# Altium PCB SOLAR_CLEANER_PCB.PcbDoc (part 1 of 2)
Units mm, origin at the board's own origin, x right, y up, seen from the top; angles counter-clockwise.
Board outline 138.79 x 100.69 mm, 2 copper layers (Top Layer, Bottom Layer); 75 components, 78 nets, 389 pads, 294 vias.
Unrouted connection lines stored in the file: 2.
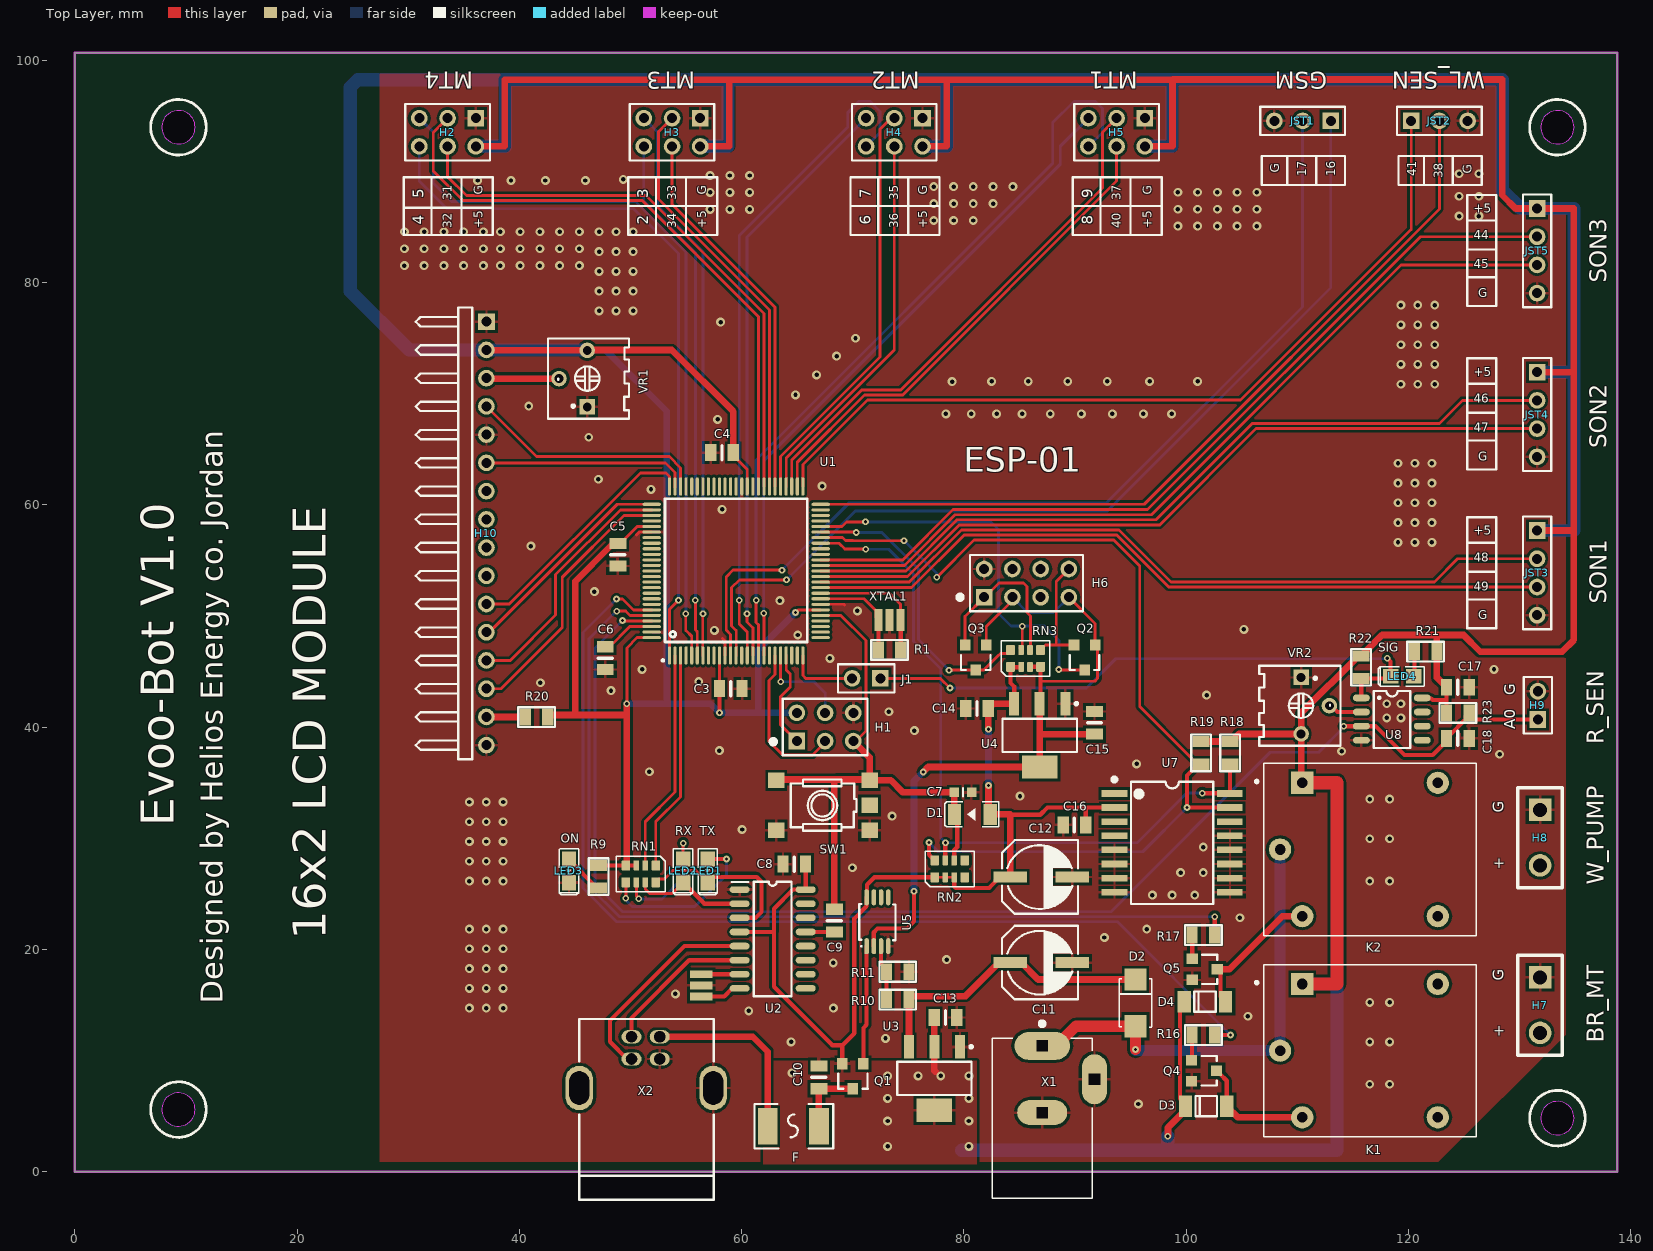
[diagram p0: Top Layer view]
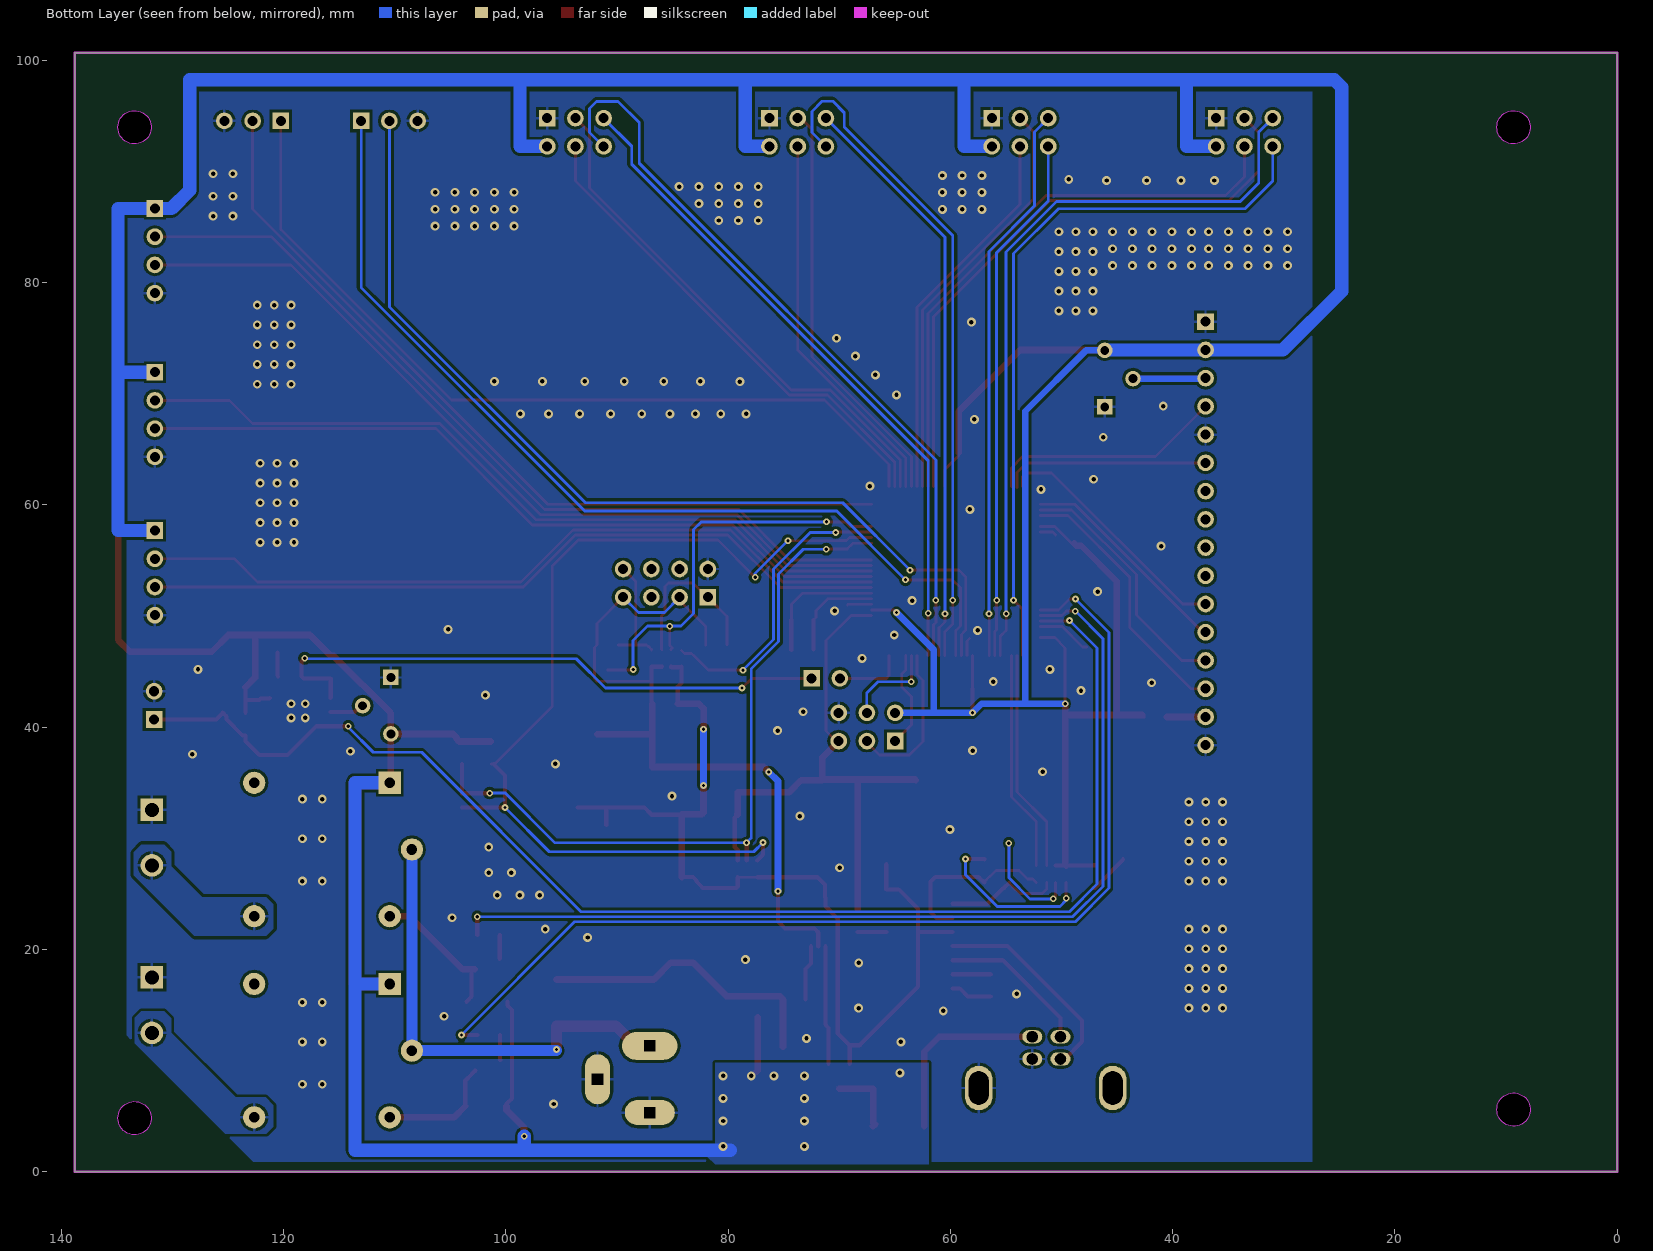
[diagram p1: Bottom Layer view, seen from below]
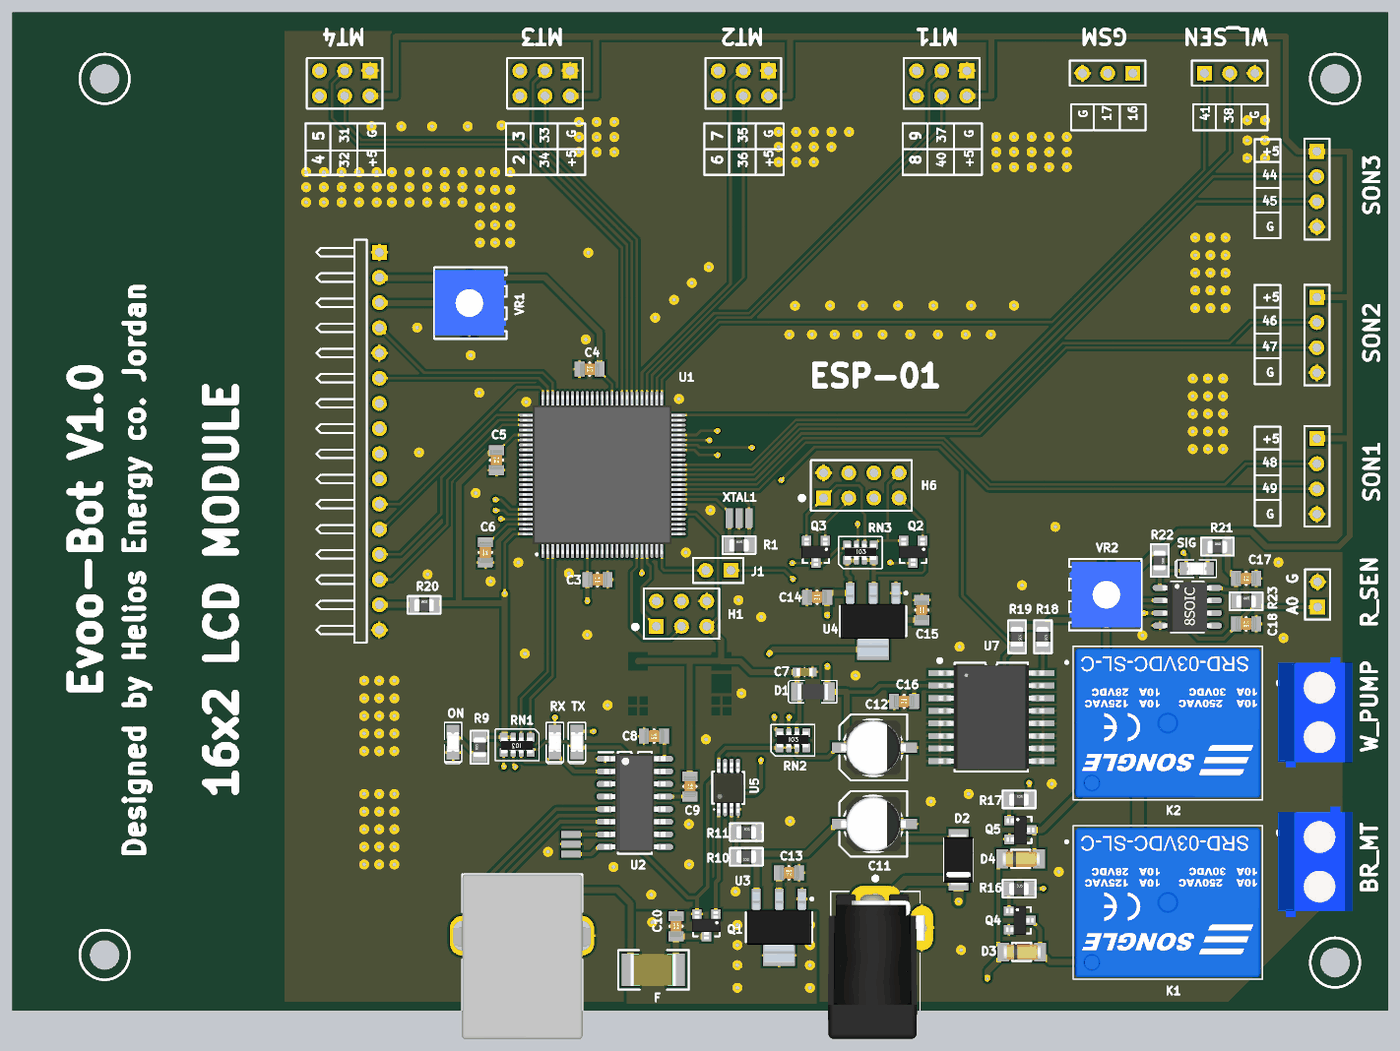
[diagram p2: 3D render of the assembled board from above, using the file's embedded part models]

## Layer stack, top to bottom
Top Solder: solder mask 0.0102, Solder Resist, Dk 3.5
Top Layer: signal copper 0.0356
Dielectric 1: dielectric 0.32, FR-4, Dk 4.8
Bottom Layer: signal copper 0.0356
Bottom Solder: solder mask 0.0102, Solder Resist, Dk 3.5

## Board outline
0,0 138.79,0 138.79,100.69 0,100.69

## Design rules (kind name [scope] priority, off if disabled: settings)
Clearance [All] p1: gap=0.254 ignorepadtopadclearanceinfootprint=FALSE except(0.127: SMDPad-SMDPad; 0.2: Arc-Arc Arc-Track Arc-SMDPad Track-Track Track-SMDPad; 0.54: THPad-THPad)
HoleSize [All] p1: absolutevalues=TRUE maxlimit=6.3 minlimit=0.2 maxpercent=80.000 minpercent=20.000
HoleToHoleClearance [All] p1: gap=0.54 allowstackedmicrovias=TRUE
MinimumAnnularRing [All] p1: minimumring=0.13
MinimumSolderMaskSliver [All] p1: minsoldermaskwidth=0.03
NetAntennae [All] p1: netantennaetolerance=0.127
PolygonConnect [All] p1: thpad.connectstyle=Relief thpad.reliefconductorwidth=0.254 thpad.reliefentries=4 thpad.polygonreliefangle="90 Angle" thpad.airgapwidth=0.254 smdpad.connectstyle=Relief smdpad.reliefconductorwidth=0.254 smdpad.reliefentries=4 smdpad.polygonreliefangle="90 Angle" smdpad.airgapwidth=0.254 via.connectstyle=Direct via.reliefconductorwidth=0.254 via.reliefentries=4 via.polygonreliefangle="90 Angle" via.airgapwidth=0.254
RoomDefinition Sensors [InComponentClass('Sensors')] p1: confinementstyle=ConfineOut formatcopy=TRUE lockcomponents=FALSE outline 145.05,60.812 355.235,60.812 355.235,104.5 145.05,104.5
RoomDefinition ESP01-Schematic [InComponentClass('ESP01-Schematic')] p2: confinementstyle=ConfineOut formatcopy=TRUE lockcomponents=FALSE outline 144.593,44.704 182.693,44.704 182.693,58.674 144.593,58.674
RoomDefinition CH340-Sch [InComponentClass('CH340-Sch')] p3: confinementstyle=ConfineOut formatcopy=TRUE lockcomponents=FALSE outline 145.863,23.622 321.504,23.622 321.504,43.307 145.863,43.307
RoomDefinition ATMEGA2560-Schematic [InComponentClass('ATMEGA2560-Schematic')] p4: confinementstyle=ConfineOut formatcopy=TRUE lockcomponents=FALSE outline 144.593,1.397 261.941,1.397 261.941,22.479 144.593,22.479
RoutingVias [All] p1: holewidth=0.342 width=0.721 viastyle="Through Hole" minholewidth=0.3 minwidth=0.6 maxholewidth=0.4 maxwidth=0.8
SilkToSolderMaskClearance [IsPad] p1: minsilkscreentomaskgap=0.15 clearancetoexposedcopper=TRUE
SolderMaskExpansion [All] p1: expansion=0.102
Width [All] p1: maxlimit=0.6 minlimit=0.254 preferedwidth=0.381 minimp=50.000000 maximp=50.000000 favimp=50.000000
25 further rules are at their usual default settings.

## Classes and differential pairs
component class Sensors: 0. C16 C17 C18 D3 D4 H7 H8 H9 H10 J1 JST1 JST2 JST3 JST4 JST5 K1 K2 LED4 Q4 Q5 R16 R17 R18 R19 R20 R21 R22 R23 U7 U8 VR1 VR2
component class ESP01-Schematic: H6 Q2 Q3 RN3
component class CH340-Sch: C8 C9 C10 C11 C12 C13 C14 C15 D2 F LED1 LED2 LED3 Q1 R9 R10 R11 RN1 U2 U3 U4 U5 U6 X1 X2
component class ATMEGA2560-Schematic: C3 C4 C5 C6 C7 D1 H1 H2 H3 H4 H5 R1 RN2 SW1 U1

## Components (designator, comment, footprint, x,y, rotation, side; value= is the part's Value field where it differs from the comment)
C3 "100nF" SMD-0805C 59.03,43.47 r90 top value=10000pF
C4 "100nF" SMD-0805C 58.24,64.71 r270 top value=10000pF
C5 "100nF" SMD-0805C 48.86,55.52 r0 top value=10000pF
C6 "100nF" SMD-0805C 47.73,46.22 r0 top value=10000pF
C7 "22pF" SMD-0603C 79.92,34.14 r90 top value=10000pF
C8 "100nF" SMD-0805C 64.74,27.68 r90 top value=10000pF
C9 "100nF" SMD-0805C 68.35,22.6 r180 top value=10000pF
C10 "100nF" SMD-0805C 66.95,8.5 r180 top value=10000pF
C11 "Cap Pol2" Elec-Cap-SMD 86.96,18.82 r0 top value="47uF 25V"
C12 "Cap Pol2" Elec-Cap-SMD 86.96,26.52 r0 top value="47uF 25V"
C13 "100nF" SMD-0805C 78.343,13.887 r270 top value=10000pF
C14 "10uF" SMD-0805C 81.18,41.69 r270 top value=10000pF
C15 "10uF" SMD-0805C 91.75,40.4 r180 top value=10000pF
C16 "100nF" SMD-0805C 89.95,31.2 r270 top value=10000pF
C17 "100nF" SMD-0805C 124.45,43.6 r90 top value=10000pF
C18 "100nF" SMD-0805C 124.45,39 r90 top value=10000pF
D1 "Diode" D1206-RD 80.76,32.16 r0 top
D2 "Diode" D0214AC(SMA-2) 95.45,15.2 r90 top
D3 "1N4148" "LL4148-L3.7 SMD(LCSC)" 99.95,5.9 r0 top
D4 "1N4148" "LL4148-L3.7 SMD(LCSC)" 99.842,15.3 r0 top
F "Fuse 1" "MF-MSMF050-2 (LCSC)" 62.35,4.1 r0 top
H1 "ICSP" HDR2X3 64.97,38.76 r0 top
H2 "MT4" HDR2X3 36.08,94.805 r180 top
H3 "MT3" HDR2X3 56.28,94.805 r180 top
H4 "MT2" HDR2X3 76.28,94.805 r180 top
H5 "MT1" HDR2X3 96.28,94.805 r180 top
H6 "Header 4X2" HDR2X4 81.83,51.7 r0 top
H7 "BR_MT" Header_I2 130.85,14 r180 top
H8 "W_PUMP" Header_I2 130.85,29.07 r180 top
H9 "R_SEN" HDR1X2 131.65,40.7 r90 top
H10 "Header 16H" HDR1X16H 37.04,76.49 r270 top locked
J1 "Jumper" HDR1X2 72.49,44.4 r180 top
JST1 "GSM" HDR1X3 113.02,94.56 r180 top
JST2 "WL_SEN" HDR1X3 120.25,94.56 r0 top
JST3 "SON1" HDR1X4 131.58,57.7 r270 top
JST4 "SON2" HDR1X4 131.58,71.95 r270 top
JST5 "SON3" HDR1X4 131.58,86.68 r270 top
K1 "SRD-05VDC-SL-C" SRD-05VDC-SL-C 116.55,10.9 r0 top
K2 "SRD-05VDC-SL-C" SRD-05VDC-SL-C 116.55,29 r0 top
LED1 "TX" Blue_LED_0805 56.94,27.08 r90 top
LED2 "RX" Blue_LED_0805 54.72,27.08 r90 top
LED3 "ON" RED_LED_0805 44.45,27.072 r90 top
LED4 "SIG" RED_LED_0805 119.45,44.6 r0 top
Q1 "FDN340P" SOT-23-3 70.005,8.63 r180 top
Q2 "BSS138" SMT_TRIODE_NPN 90.85,46.3 r180 top
Q3 "BSS138" SMT_TRIODE_NPN 81.05,46.3 r180 top
Q4 "NPN" SMT_TRIODE_NPN 101.595,9.088 r270 top
Q5 "NPN" SMT_TRIODE_NPN 101.65,18.2 r270 top
R1 "1M" SMD-0805-RES 73.31,46.96 r270 top value=1.1
R9 "1K" SMD-0805-RES 47.13,26.56 r0 top value=1.1
R10 "10K" SMD-0805-RES 74.05,15.5 r90 top value=1.1
R11 "10K" SMD-0805-RES 74.05,18 r270 top value=1.1
R16 "" SMD-0805-RES 101.55,12.3 r270 top value=1K
R17 "" SMD-0805-RES 101.55,21.3 r270 top value=1K
R18 "4.7K" SMD-0805-RES 103.95,37.7 r180 top value=1
R19 "4.7K" SMD-0805-RES 101.35,37.7 r180 top value=1
R20 "220" SMD-0805-RES 41.55,40.92 r270 top value=1
R21 "1K" SMD-0805-RES 121.55,46.8 r270 top value=1
R22 "10K" SMD-0805-RES 115.75,45.4 r180 top value=1
R23 "10K" SMD-0805-RES 124.45,41.3 r270 top value=1
RN1 "1K" RA0603-8 50.93,26.8 r180 top
RN2 "10K" RA0603-8 78.73,27.26 r0 top
RN3 "10K" RA0603-8 85.55,46.2 r0 top
SW1 "SPDT SW" SPDT-5Pin 69.488,-52.709 r180 top
U1 "ATMEGA2560-16AU" TQFP-100(LCSC) 59.513,54.062 r0 top
U2 "CH340C" "SOIC-16 150MIL(LCSC)" 62.795,20.947 r0 top
U3 "AMS117-5.0" SOT-223 77.273,8.426 r270 top
U4 "AMS117-3.3" SOT-223 86.75,39.3 r270 top
U5 "LM358N" VSSOP-8 71.25,18.69 r90 top
U7 "DS3231SN#" DS3231(Module-footprint) 98.75,29.6 r0 top
U8 "LM393EDR2G" SOIC-8 114.7,42.64 r0 top
VR1 "RPot" VR7(LCSC) 46.11,71.37 r90 top value=10K
VR2 "RPot" VR7(LCSC) 110.35,41.94 r270 top value=10K
X1 "PJ-002A" PJ-002A 87.052,11.326 r270 top
X2 "USB-TH" "USB-TypeB Female (LCSC)" 44.896,9.241 r0 top

## Footprints (in the part's own frame and the unit in brackets; to place one, negate y for a bottom-side part, rotate by r counter-clockwise, add the part's x,y. Pads: shape width x height; smd on the part's side, far side on the other; paste and mask are expansions set on the pad)
Blue_LED_0805 [mm] "SMT 0805 Blue LED"
  rect 1.4x1.3 smd: 1(1.05,-0.02) 2(-1.05,-0.02)
  silkscreen extent -2.17,-0.89 1.98,0.86, body extent -1,-0.64 1,0.61, height 0.8
D0214AC(SMA-2) [mm] "SMA D0214AC Schottky Barrier Diode"
  rect 2x2 smd: 1(-2.1,0) 2(2.1,0)
  silkscreen extent -2.18,-1.48 2.18,1.48, body extent -2.63,-1.47 2.65,1.45, height 2.41
D1206-RD [mm] "Switching Chip Diode by Bourns, 1206 Package Type"
  rect 1.2x1.9 smd: 1(-1.6,0) 2(1.6,0)
  silkscreen extent -2.47,-1.13 2.4,1.13, body extent -1.53,-0.78 1.52,0.77, height 0.65
DS3231(Module-footprint) [mm]
  rect 2.3x0.6 smd paste+0 mask+0: 1(-5.195,4.445) 2(-5.195,3.175) 3(-5.195,1.905) 4(-5.195,0.635) 5(-5.195,-0.635) 6(-5.195,-1.905) 7(-5.195,-3.175) 8(-5.195,-4.445) 9(5.195,-4.445) 10(5.195,-3.175) 11(5.195,-1.905) 12(5.195,-0.635) 13(5.195,0.63) 14(5.194,1.905) 15(5.194,3.175) 16(5.194,4.445)
  silkscreen extent -5.3,-5.5 3.7,5.8, body extent -5.32,-5.24 5.32,5.25, height 2.64
Elec-Cap-SMD [mm] "L6.6-W6.6-H7.0-LS7.2"
  rect 3x1 smd: 1(-2.8,0) 2(2.8,0)
  silkscreen extent -3.53,-3.3 3.3,3.32, body extent -3.36,-2.76 3.14,2.74, height 5.5
HDR1X2 [mm] "Connector; Header; 2 Position"
  rect 1.5x1.5 hole 0.9: 1(0,0)
  round 1.5 hole 0.9: 2(2.54,0)
  silkscreen extent -1.27,-1.27 3.81,1.27
HDR1X3 [mm] "Connector; Header; 3 Position"
  rect 1.5x1.5 hole 0.9: 1(0,0)
  round 1.5 hole 0.9: 2(2.54,0) 3(5.08,0)
  silkscreen extent -1.27,-1.27 6.35,1.27
HDR1X4 [mm] "Connector; Header; 4 Position"
  rect 1.5x1.5 hole 0.9: 1(0,0)
  round 1.5 hole 0.9: 2(2.54,0) 3(5.08,0) 4(7.62,0)
  silkscreen extent -1.27,-1.27 8.89,1.27
HDR1X16H [mm] "Connector; Header; 16 Position; Right Angle"
  rect 1.5x1.5 hole 0.9: 1(0,0)
  round 1.5 hole 0.9: 2(2.54,0) 3(5.08,0) 4(7.62,0) 5(10.16,0) 6(12.7,0) 7(15.24,0) 8(17.78,0) 9(20.32,0) 10(22.86,0) 11(25.4,0) 12(27.94,0) 13(30.48,0) 14(33.02,0) 15(35.56,0) 16(38.1,0)
  silkscreen extent -1.27,-6.35 39.37,-1.27
HDR2X3 [mm] "Connector; Header; 3x2 Position"
  rect 1.5x1.5 hole 0.9: 1(0,0)
  round 1.5 hole 0.9: 2(0,2.54) 3(2.54,0) 4(2.54,2.54) 5(5.08,0) 6(5.08,2.54)
  silkscreen extent -1.27,-1.27 6.35,3.81
HDR2X4 [mm] "Connector; Header; 4x2 Position"
  rect 1.5x1.5 hole 0.9: 1(0,0)
  round 1.5 hole 0.9: 2(0,2.54) 3(2.54,0) 4(2.54,2.54) 5(5.08,0) 6(5.08,2.54) 7(7.62,0) 8(7.62,2.54)
  silkscreen extent -1.27,-1.27 8.89,3.81
Header_I2 [mm] "2-pin Custom Header"
  round 2.032 hole 1.27 mask+0.005: 1(-1,1.5)
  rect 2.032x2.032 hole 1.27 mask+0.005: 2(-1,-3.5)
  silkscreen extent -3,-5.5 1,3.5, body extent -4.3,-6.58 3.2,4.58, height 10
"LL4148-L3.7 SMD(LCSC)" [mm] "LL-34_L3.7-W1.6-RD, Reference to T4 Diode"
  rect 1.2x1.9 smd: 1(3.708,0) 2(0,0)
  silkscreen extent 0.9,-0.91 2.82,0.92, body extent 0.06,-0.8 3.76,0.8, height 1.59
"MF-MSMF050-2 (LCSC)" [mm] "Fuse by Bourns SMD CODE-506J"
  rect 1.78x3.3 smd: 1(0,0) 2(4.61,0)
  silkscreen extent -1.2,-2 5.9,2, body extent 0.03,-1.62 4.58,1.62, height 0.85
PJ-002A [mm]
  oval 2.5x5 hole 1 square: 1(0,0)
  oval 2.25x4.5 hole 1 square: 2(6,0)
  oval 4.5x2.25 hole 1 square: 3(3,4.7)
  silkscreen extent -2.2,-4.5 13.7,4.5, body extent -0.44,-4.78 14.18,4.99, height 12
RA0603-8 [mm]
  rrect25% 0.8x0.9 smd: 1(-1.35,-0.762) 4(1.35,-0.762) 5(1.35,0.762) 8(-1.35,0.762)
  rrect25% 0.5x0.89 smd: 2(-0.4,-0.762) 7(-0.4,0.762)
  rrect25% 0.5x0.9 smd: 3(0.4,-0.762) 6(0.4,0.762)
  silkscreen extent -2.2,-1.6 2.2,1.6, body extent -1.6,-0.73 1.6,0.87, height 0.61
RED_LED_0805 [mm] "SMT 0805 Red LED"
  rect 1.4x1.3 smd: 1(1.05,-0.02) 2(-1.05,-0.02)
  silkscreen extent -2.16,-0.9 1.99,0.85, body extent -1,-0.64 1,0.61, height 0.8
SMD-0603C [mm]
  rect 0.85x0.85 smd: 1(0,0.775) 2(0,-0.775)
  silkscreen extent -0.4,0 0.4,0, body extent -0.4,-0.8 0.4,0.8, height 0.9
SMD-0805-RES [mil]
  rect 60x40 smd: 1(0,40) 2(0,-40)
  silkscreen extent -35,-65 35,65, body extent -24,-39 26,39, height 31
SMD-0805C [mil]
  rect 60x40 smd: 1(0,40) 2(0,-40)
  silkscreen extent -25,0 25,0, body extent -25,-39 25,39, height 35
SMT_TRIODE_NPN [mm] "Surface mount NPN transistor, package SOT-23"
  rect 0.95x1 smd: 1(-0.962,-1.095) 2(0.938,-1.095) 3(-0.012,1.155)
  silkscreen extent -1.34,-0.2 1.31,1.15, body extent -1.46,-1.37 1.44,1.43, height 1.3
SOIC-8 [mm] "_L5.0-W4.0-P1.27-LS6.0-BL"
  oval 1.52x0.6 smd: 1(1.07,0) 2(1.07,-1.27) 3(1.07,-2.54) 4(1.07,-3.81) 5(6.55,-3.81) 6(6.55,-2.54) 7(6.55,-1.27) 8(6.55,0)
  silkscreen extent 2.18,-4.5 5.46,0.63, body extent 0.69,-4.41 6.89,0.59, height 1.5
"SOIC-16 150MIL(LCSC)" [mm] "L10.0-W3.9-P1.27-LS6.0-BL"
  oval 1.8x0.6 smd: 1(-2.972,4.445) 2(-2.972,3.175) 3(-2.972,1.905) 4(-2.972,0.635) 5(-2.972,-0.635) 6(-2.972,-1.905) 7(-2.972,-3.175) 8(-2.972,-4.445) 9(2.972,-4.445) 10(2.972,-3.175) 11(2.972,-1.905) 12(2.972,-0.635) 13(2.972,0.635) 14(2.972,1.905) 15(2.972,3.175) 16(2.972,4.445)
  silkscreen extent -3.68,-5.15 1.7,5.15, body extent -3.1,-4.95 3.1,4.96, height 1.7
SOT-23-3 [mm] "Surface mount NPN transistor, package SOT-23"
  rect 0.95x1 smd: 1(-0.962,-1.095) 2(0.938,-1.095) 3(-0.012,1.155)
  silkscreen extent -1.34,-0.2 1.31,1.15, body extent -1.46,-1.37 1.44,1.43, height 1.3
SOT-223 [mm] "3 LEAD SOT-223 PLASTIC PACKAGE"
  rect 2.1x0.9 smd: 1(-2.825,2.376) 2(-2.825,0.076) 3(-2.825,-2.224)
  rect 2.1x3.2 smd: 2(2.875,0.076)
  silkscreen extent -2.95,-3.27 1.53,3.5, body extent -3.52,-3.17 3.57,3.33, height 1.65
SPDT-5Pin [mm]
  rect 1.5x1.425 smd: 1(-2.032,-83.439) 2(6.368,-83.439) 3(-2.032,-87.939) 4(6.368,-87.939) 5(-2.032,-85.689)
  silkscreen extent -0.86,-88 5.07,-83.4, body extent -2.34,-88.71 6.68,-82.67, height 5
SRD-05VDC-SL-C [mm] "SRD05VDC Relay , SPDT, 5 pin"
  rect 2x2 hole 0.95: A1(-6.1,6)
  round 2 hole 0.95: A2(-6.1,-6) COM(-8.1,0) NC(6.1,6) NO(6.1,-6)
  silkscreen extent -10.3,-7.75 9.55,7.75, body extent -9.35,-7.54 9.35,7.54, height 14.94
TQFP-100(LCSC) [mm] "_L14.0-W14.0-P0.50-LS16.0-BL"
  oval 0.28x1.65 smd: 1(-6,-7.6) 2(-5.5,-7.6) 3(-5,-7.6) 4(-4.5,-7.6) 5(-4,-7.6) 6(-3.5,-7.6) 7(-3,-7.6) 8(-2.5,-7.6) 9(-2,-7.6) 10(-1.5,-7.6) 11(-1,-7.6) 12(-0.5,-7.6) 13(0,-7.6) 14(0.5,-7.6) 15(1,-7.6) 16(1.5,-7.6) 17(2,-7.6) 18(2.5,-7.6) 19(3,-7.6) 20(3.5,-7.6) 21(4,-7.6) 22(4.5,-7.6) 23(5,-7.6) 24(5.5,-7.6) 25(6,-7.6) 51(6,7.6) 52(5.5,7.6) 53(5,7.6) 54(4.5,7.6) 55(4,7.6) 56(3.5,7.6) 57(3,7.6) 58(2.5,7.6) 59(2,7.6) 60(1.5,7.6) 61(1,7.6) 62(0.5,7.6) 63(0,7.6) 64(-0.5,7.6) 65(-1,7.6) 66(-1.5,7.6) 67(-2,7.6) 68(-2.5,7.6) 69(-3,7.6) 70(-3.5,7.6) 71(-4,7.6) 72(-4.5,7.6) 73(-5,7.6) 74(-5.5,7.6) 75(-6,7.6)
  oval 1.65x0.28 smd: 26(7.6,-6) 27(7.6,-5.5) 28(7.6,-5) 29(7.6,-4.5) 30(7.6,-4) 31(7.6,-3.5) 32(7.6,-3) 33(7.6,-2.5) 34(7.6,-2) 35(7.6,-1.5) 36(7.6,-1) 37(7.6,-0.5) 38(7.6,0) 39(7.6,0.5) 40(7.6,1) 41(7.6,1.5) 42(7.6,2) 43(7.6,2.5) 44(7.6,3) 45(7.6,3.5) 46(7.6,4) 47(7.6,4.5) 48(7.6,5) 49(7.6,5.5) 50(7.6,6) 76(-7.6,6) 77(-7.6,5.5) 78(-7.6,5) 79(-7.6,4.5) 80(-7.6,4) 81(-7.6,3.5) 82(-7.6,3) 83(-7.6,2.5) 84(-7.6,2) 85(-7.6,1.5) 86(-7.6,1) 87(-7.6,0.5) 88(-7.6,0) 89(-7.6,-0.5) 90(-7.6,-1) 91(-7.6,-1.5) 92(-7.6,-2) 93(-7.6,-2.5) 94(-7.6,-3) 95(-7.6,-3.5) 96(-7.6,-4) 97(-7.6,-4.5) 98(-7.6,-5) 99(-7.6,-5.5) 100(-7.6,-6)
  silkscreen extent -6.7,-8.15 6.4,6.5, body extent -8,-8 8,8, height 1.2
"USB-TypeB Female (LCSC)" [mm] "USB-B-TH_U241-041N-1BR85-1"
  oval 1.8x1.2 hole 1 slot 1.001 at 90 deg: 1(7.739,2.909) 2(5.199,2.909) 3(5.199,0.909) 4(7.739,0.909)
  oval 2.5x4 hole 1.8 slot 3 at 90 deg: 5(12.55,-1.7) 6(0.5,-1.7)
  silkscreen extent 0.5,-11.76 12.6,4.5, body extent -0.9,-12.1 14,4.5, height 10.75
VR7(LCSC) [mm] "Through Hole, 3 Leads, Pitch 5.08mm Trimmer"
  rect 1.4x1.4 hole 0.8: 1(-2.54,0)
  round 1.4 hole 0.8: 2(0,2.54) 3(2.54,0)
  silkscreen extent -3.6,-3.77 3.6,3.54, body extent -3.3,-3.7 3.3,3.5, height 4.7
VSSOP-8 [mm] "L3.0-W3.0-H1.1-LS4.9-P0.65"
  oval 1.45x0.4 smd: 1(1.61,0) 2(1.61,-0.65) 3(1.61,-1.3) 4(1.61,-1.95) 5(6.01,-1.95) 6(6.01,-1.3) 7(6.01,-0.65) 8(6.01,0)
  silkscreen extent 1.59,-2.6 5.4,0.66, body extent 1.26,-2.54 6.31,0.56, height 1.1

## Part data
C3 C4 C5 C6 C7 C8 C9 C10 C13 C14 C15 C16 C17 C18: library part GC321AD72E103KX01D, "CAP CER 10000PF 250V X7T 0805", Digi-Key Part Number=490-13986-1-ND, Manufacturer="Murata Electronics North America", Operating Temperature="-55°C ~ 125°C", Package / Case="0805 (2012 Metric)", Ratings=AEC-Q200, Temperature Coefficient=X7T, Tolerance=±10%, Voltage=250V, @ qty=0, Applications=Automotive, Datasheets=http://search.murata.co.jp/Ceramy/image/img/A01X/G101/ENG/GC321AD72E103KX01-01.pdf, Factory Stock=0, Features=-, Height - Seated (Max)=-, Image=//media.digikey.com/Renders/Murata%20Renders/0805(GC3)200x125.jpg, Lead Spacing=-, Lead Style=-, Minimum Quantity=1, Mounting Type="Surface Mount, MLCC", Packaging="Cut Tape (CT)", Part Number=GC321AD72E103KX01D, Part Status=Active, Quantity Available=4000, Series=GC3, Size / Dimension="0.079\" L x 0.049\" W (2.00mm x 1.25mm)", Thickness (Max)="0.039\" (1.00mm)", Unit Price (USD)=0.3
C11 C12: "Polarized Capacitor (Axial)", LatestRevisionDate=17-Jul-2002, LatestRevisionNote="Re-released for DXP Platform.", PackageDescription="Polarized Capacitor; 2 Leads", PackageReference=POLAR0.8, Published=8-Jun-2000, Publisher="Altium Limited"
D1 D2: "Default Diode", Code_JEDEC=DO-214-AB, LatestRevisionDate=17-Jul-2002, LatestRevisionNote="Re-released for DXP Platform.", PackageDescription="DO-214-AB/SMC; 2 C-Bend Leads; Body 7.9 x 5.9 mm, inc. leads (LxW)", PackageReference=SMC, PackageVersion=Sep-1996, Published=8-Jun-2000, Publisher="Altium Limited"
D3 D4: library part "Diode 1N4148", "High Conductance Fast Diode", Code_JEDEC=DO-204-AH, ComponentLink1Description="Manufacturer Link", ComponentLink1URL=http://www.fairchildsemi.com/, ComponentLink2Description=Datasheet, ComponentLink2URL=http://www.fairchildsemi.com/ds/1N%2F1N4148.pdf, DatasheetVersion=1997, LatestRevisionDate=17-Jul-2002, LatestRevisionNote="Re-released for DXP Platform.", PackageDescription="Diode, Axial; Body 3.8 x 1.9 mm (LxDia. max), Lead Dia. 0.53 mm (max)", PackageReference=DO-35, Published=8-Jun-2000, Publisher="Altium Limited"
F: "Fuse", LatestRevisionDate=17-Jul-2002, LatestRevisionNote="Re-released for DXP Platform.", PackageDescription="Thru-Hole; 2 Leads", PackageReference=PIN-W2/E2.8, Published=8-Jun-2000, Publisher="Altium Limited"
H1 H2 H3 H4 H5: library part "Header 3X2", "Header, 3-Pin, Dual row", LatestRevisionDate=17-Jul-2002, LatestRevisionNote="Re-released for DXP Platform.", Publisher="Altium Limited"
H6: "Header, 4-Pin, Dual row", LatestRevisionDate=17-Jul-2002, LatestRevisionNote="Re-released for DXP Platform.", Publisher="Altium Limited"
H7 H8: library part Header_I2, "2-pin single line header (in Blue/green color) Normal", DateCreated=03/08/2020
H9 J1: library part "Header 2", "Header, 2-Pin", LatestRevisionDate=17-Jul-2002, LatestRevisionNote="Re-released for DXP Platform.", Publisher="Altium Limited"
H10: "Header, 16-Pin, Right Angle", LatestRevisionDate=17-Jul-2002, LatestRevisionNote="Re-released for DXP Platform.", Publisher="Altium Limited"
JST1 JST2: library part "Header 3", "Header, 3-Pin", LatestRevisionDate=17-Jul-2002, LatestRevisionNote="Re-released for DXP Platform.", Publisher="Altium Limited"
JST3 JST4 JST5: library part "Header 4", "Header, 4-Pin", LatestRevisionDate=17-Jul-2002, LatestRevisionNote="Re-released for DXP Platform.", Publisher="Altium Limited"
K1 K2: "5V Trigger Relay Module For Arduino And Raspberry Pi 5V Trigger Relay Module For Arduino And Raspberry Pi", Package=None, Availability=Unavailable, MF="Songle Relay", MP=SRD-05VDC-SL-C, Price=None, SnapEDA_Link=https://www.snapeda.com/parts/SRD-05VDC-SL-C/Songle%20Relay/view-part/1029484/?ref=snap
LED1 LED2 LED3 LED4: library part "LED 5V", "SMT LED"
Q1: "P-Channel  MOSFET SMD CODE=A1SHB", ComponentLink1Description="Manufacturer Link", ComponentLink1URL=http://www.irf.com/, DatasheetVersion=PD-9.814, LatestRevisionDate=17-Jul-2002, LatestRevisionNote="Re-released for DXP Platform.", Note="Pin 2 is electrically connected to pin 4.", PackageDescription="TO, Thru-Hole, Vertical, Heatsink Mounted; 3 In-Line Leads; Pitch 2.54 mm", PackageReference=TO-220AB, PackageVersion=Feb-1997, Published=8-Jun-2000, Publisher="Altium Limited"
Q2 Q3: "N-Channel Power MOSFET", ComponentLink1Description="Manufacturer Link", ComponentLink1URL=http://www.irf.com/, DatasheetVersion=PD-9.814, LatestRevisionDate=17-Jul-2002, LatestRevisionNote="Re-released for DXP Platform.", Note="Pin 2 is electrically connected to pin 4.", PackageDescription="TO, Thru-Hole, Vertical, Heatsink Mounted; 3 In-Line Leads; Pitch 2.54 mm", PackageReference=TO-220AB, PackageVersion=Feb-1997, Published=8-Jun-2000, Publisher="Altium Limited"
Q4 Q5: library part S8050, "S8050 NPN Bipolar Junction Transistor", Code_JEDEC=TO-226-AA, LatestRevisionDate=17-Jul-2002, LatestRevisionNote="Re-released for DXP Platform.", PackageDescription="TO, Flat Index; 3 In-Line, Axial Leads; Body Dia. 4.8mm; Leads 0.55 x 0.51 mm (max)", PackageReference=TO-226-AA, Published=8-Jun-2000, Publisher="Altium Limited"
R1 R9 R10 R11: library part ERJ-6BQF1R1V, "RES SMD 1.1 OHM 1% 1/3W 0805", Digi-Key Part Number=P17500CT-ND, Manufacturer="Panasonic Electronic Components", Operating Temperature="-55°C ~ 125°C", Package / Case="0805 (2012 Metric)", Power (Watts)="0.333W, 1/3W", Supplier Device Package=0805, Temperature Coefficient=±200ppm/°C, Tolerance=±1%, @ qty=1500, Composition="Thick Film", Datasheets=https://industrial.panasonic.com/cdbs/www-data/pdf/RDA0000/AOA0000C239.pdf, Factory Stock=0, Failure Rate=-, Features="Automotive AEC-Q200, Current Sense", Height - Seated (Max)="0.028\" (0.70mm)", Image=//media.digikey.com/Renders/Panasonic%20Renders/ERJ-0805%20Pkg.jpg, Minimum Quantity=1, Number of Terminations=2, Packaging="Cut Tape (CT)", Part Number=ERJ-6BQF1R1V, Part Status=Active, Quantity Available=34000, Series=ERJ, Size / Dimension="0.079\" L x 0.049\" W (2.00mm x 1.25mm)", Unit Price (USD)=0.05834
R16 R17: library part Res1, "Resistor", LatestRevisionDate=17-Jul-2002, LatestRevisionNote="Re-released for DXP Platform.", PackageDescription="Axial Device, Thru-Hole; 2 Leads; 0.3 in Pin Spacing", PackageReference=AXIAL-0.3, Published=8-Jun-2000, Publisher="Altium Limited"
R18 R19 R20 R21 R22 R23: library part ERJ-6BQF1R0V, "RES SMD 1 OHM 1% 1/3W 0805", Digi-Key Part Number=P17499CT-ND, Manufacturer="Panasonic Electronic Components", Operating Temperature="-55°C ~ 125°C", Package / Case="0805 (2012 Metric)", Power (Watts)="0.333W, 1/3W", Supplier Device Package=0805, Temperature Coefficient=±200ppm/°C, Tolerance=±1%, @ qty=1500, Composition="Thick Film", Datasheets=https://industrial.panasonic.com/cdbs/www-data/pdf/RDA0000/AOA0000C239.pdf, Factory Stock=0, Failure Rate=-, Features="Automotive AEC-Q200, Current Sense", Height - Seated (Max)="0.028\" (0.70mm)", Image=//media.digikey.com/Renders/Panasonic%20Renders/ERJ-0805%20Pkg.jpg, Minimum Quantity=1, Number of Terminations=2, Packaging="Cut Tape (CT)", Part Number=ERJ-6BQF1R0V, Part Status=Active, Quantity Available=808, Series=ERJ, Size / Dimension="0.079\" L x 0.049\" W (2.00mm x 1.25mm)", Unit Price (USD)=0.05834
RN1 RN2 RN3: library part RES_NETWORK, "330 Ohm ±5% 62.5mW Power Per Element Isolated Resistor Network/Array ±200ppm/°C 1206 _3216 Metric_, Convex, Long Side Terminals", Package="1206 Yageo", Availability=Unavailable, MF=Yageo, MP=YC164-JR-07330RL, Price=None, SnapEDA_Link=https://www.snapeda.com/parts/YC164-JR-07330RL/Yageo/view-part/106017/?ref=snap
SW1: library part SPDT-SWITCH
U1: library part "ATMEGA2560-16AU (LCSC)", "Integrated Circuit", Manufacturer_Name=Microchip, Height=1.2mm, Manufacturer_Part_Number=ATMEGA2560-16AU
U2: "Integrated Circuit", Manufacturer_Name="Maxim Integrated", Manufacturer_Part_Number=DS3231SN#, Mouser Part Number=700-DS3231SN#, RS Part Number=1897251, Datasheet Link=https://datasheets.maximintegrated.com/en/ds/DS3231.pdf, Height=2.65mm, Mouser Price/Stock=https://www.mouser.com/Search/Refine.aspx?Keyword=700-DS3231SN%23, RS Price/Stock=http://uk.rs-online.com/web/p/products/1897251
U3 U4: library part AMS1117, "AMS1117-3.3, Voltage Regulator"
U5: "Integrated Circuit", Manufacturer_Name="ON Semiconductor", Mouser Part Number=512-LM358N, Arrow Part Number=LM358N, Arrow Price/Stock=https://www.arrow.com/en/products/lm358n/on-semiconductor, Datasheet Link=http://www.onsemi.com/pub/Collateral/LM358A-D.pdf, Height=5.33mm, Manufacturer_Part_Number=LM358N, Mouser Price/Stock=https://www.mouser.co.uk/ProductDetail/ON-Semiconductor-Fairchild/LM358N?qs=K0aVCp%2F7QwafyMXZgr%2FPfw%3D%3D
U7: "Real Time Clock IC", Manufacturer_Name="Maxim Integrated", Mouser Part Number=700-DS3231SN#, RS Part Number=1897251, Datasheet Link=https://datasheets.maximintegrated.com/en/ds/DS3231.pdf, Height=2.65mm, Manufacturer_Part_Number=DS3231SN#, Mouser Price/Stock=https://www.mouser.com/Search/Refine.aspx?Keyword=700-DS3231SN%23, RS Price/Stock=http://uk.rs-online.com/web/p/products/1897251
U8: library part LM358N, "Integrated Circuit", Manufacturer_Name="ON Semiconductor", Mouser Part Number=512-LM358N, Arrow Part Number=LM358N, Arrow Price/Stock=https://www.arrow.com/en/products/lm358n/on-semiconductor, Datasheet Link=http://www.onsemi.com/pub/Collateral/LM358A-D.pdf, Height=5.33mm, Manufacturer_Part_Number=LM358N, Mouser Price/Stock=https://www.mouser.co.uk/ProductDetail/ON-Semiconductor-Fairchild/LM358N?qs=K0aVCp%2F7QwafyMXZgr%2FPfw%3D%3D
VR1 VR2: "Potentiometer", LatestRevisionDate=17-Jul-2002, LatestRevisionNote="Re-released for DXP Platform.", PackageDescription="Variable Resistor, Thru-Hole; 3 Leads", PackageReference=VR5, Published=8-Jun-2000, Publisher="Altium Limited", Set Position=0.5, Sim Note="Enter the Resistance value and the set point into parameter fields."
X1: "2,0 x 6,5 mm, 2,5 A, Yatay, Açık Delik, Dc Güç Jakı Konnektörü", Package=None, Availability=Unavailable, CUI_purchase_URL=https://www.cuidevices.com/product/interconnect/connectors/dc-power-connectors/jacks/pj-002a?utm_source=snapeda.com&utm_medium=referral&utm_campaign=snapedaBOM, MF="CUI Devices", MP=PJ-002A, Price=None, SnapEDA_Link=https://www.snapeda.com/parts/PJ-002A/CUI%20Devices/view-part/287588/?ref=snap
X2: library part "USB-Type B", "USB-Type B Female"

## Free pads (board coordinates)
  round 0 hole 3 unplated mask+0.1: 0(9.331,5.599) 0(9.331,93.989) 0(133.411,4.829) 0(133.411,93.989)
  rect 1.999x0.701 smd: 1(56.378,17.767) 2(56.378,16.776) 3(56.378,15.785)
  rect 0.701x1.999 smd: 1(74.307,49.662) 2(73.316,49.662) 3(72.325,49.662)

## Via types
v1: diameter 0.8, hole 0.4, Top Layer to Bottom Layer, 250 vias
v2: diameter 0.6, hole 0.3, Top Layer to Bottom Layer, 44 vias

## Nets (pads, with @x,y where several pads share a name; then routed paths per layer and width w, separated by ;. In a path a pad name is that pad's centre, name@x,y a point inside that pad or via, vN(x,y) a via of type N, cw(c..) or ccw(c..) an arc to the next point about the centre after c; other vN are vias at no path point)
+3.3: C15.1 H6.3 H6.7 Q2.1 Q3.1 RN3.3 RN3.4 U4.2 U5.2 | length 69.6
  Top Layer w0.254: Q3.1 82.012,49.062 84.37,51.42 H6.3 ; 86.9,44.14 91.78,44.14 92.02,44.38 92.02,47.187 Q2.1 91.812,49.338 H6.7
  Top Layer w0.381: U5.2 71.9,21.56 72.24,21.9 74.88,21.9 75.52,22.54 v2(75.52,25.25) ; RN3.3 RN3.4 86.9,44.14 86.9,42.198 U4.2@86.826,42.125
  Top Layer w0.6: v2(76.34,35.98) 76.785,36.425 86.826,36.425 U4.2@86.826,42.125 ; 86.936,39.384 C15.1
  Bottom Layer w0.254: H6.3 85.74,50.33 88.08,50.33 H6.7
  Bottom Layer w0.6: v2(75.52,25.25) 75.52,35.16 v2(76.34,35.98)
+5: C3.1 C4.1 C5.1 C8.2 C12.1 C13.2 C14.1 C16.1 C17.1 D1.2 D3.2 D4.2 H1.2 H2.2 H3.2 H4.2 H5.2 H10.2 JST3.1 JST4.1 JST5.1 K1.A1 K2.A1 Q1.2 R9.1 R18.2 R19.2 R20.1 R21.1 R22.2 R23.2 RN1.3 RN1.4 RN2.1 RN2.2 RN2.3 RN3.1 RN3.2 U1.10 U1.31 U1.61 U1.80 U1.100 U2.4 U2.16 U3.2 U4.3 U5.8 U7.2 U8.8 VR1.3 VR2.3 | length 834.8
  Top Layer w0.254: R20.1 R20.1@42.746,41.1 ; C5.1@49.06,56.516 50.606,58.062 U1.80 ; v2(49.68,42.12) 49.68,47.14 50.602,48.062 U1.100 ; v2(58.01,41.3) v2@58.014,41.304 ; U1.10 58.013,43.471 C3.1 ; C4.1 59.256,64.454 60.513,63.197 U1.61 ; v2(64.85,50.32) 65.092,50.562 U1.31 ; U5.8 U5.8@71.278,24.728 ; RN2.1 RN2.2 RN2.3
  Top Layer w0.381: R9.1@46.903,27.576 R9.1 47.144,27.562 RN1.4 RN1.3 ; v2@58.014,41.304 C3.1 ; U2.4 62.906,21.582 ; C8.2@65.756,27.426 C8.2 65.767,27.669 U2.16 64.642,25.392 62.924,23.674 62.924,21.6 62.906,21.582 ; Q1.2 69.067,11.383 ; U5.8 71.25,23.9 70.144,22.794 70.144,12.461 69.067,11.383 ; U5.8@71.278,24.728 71.278,25.828 71.948,26.498 RN2.1 ; RN2.3 79.13,25.688 79.279,25.539 82.277,25.539 82.85,26.112 82.85,26.21 83.16,26.52 C12.1 ; 84.16,32.13 86.88,32.13 87.525,32.775 90.95,32.775 ; U4.3 84.526,43.658 84.2,43.984 RN3.1 84.238,45.4 85.112,45.4 RN3.2 ; C16.1 90.966,32.759 90.95,32.775 ; U7.2 90.95,32.775 ; D4.2 99.842,14.95 99.45,14.558 99.45,6.575 D3.2@99.933,6.152 ; U8.8 121.292,42.598 122.052,42.598 122.2,42.45 123.434,42.45 ; R23.2 123.434,42.45 ; C17.1 123.434,42.45 ; 62.906,21.582 62.906,16.644 68.167,11.383 69.067,11.383
  Top Layer w0.6: H2.2 38.69,92.265 38.69,98.25 58.9,98.25 ; H10.2 37.08,73.91 VR1.3 46.14,73.94 53.72,73.94 59.256,68.404 C4.1 ; R20.1@42.746,41.1 45.03,41.1 ; C5.1 48.652,56.328 48.228,56.328 45.03,53.13 45.03,41.1 ; RN1.4 49.68,27.662 49.68,41.12 ; v2(49.68,42.12) 49.68,41.12 ; H3.2 58.9,92.265 58.9,98.25 ; H4.2 78.46,92.265 78.46,98.25 ; C13.2 77.338,13.876 77.338,11.262 77.349,11.251 77.349,9.101 77.45,9 ; v2(82.21,34.76) 82.21,32.31 D1.2 84.16,32.16 ; v2(82.21,39.83) 82.196,39.844 C14.1 82.24,41.69 82.675,42.125 U4.3 ; C12.1 84.16,32.13 ; H5.2 98.78,92.265 98.78,98.25 ; v2(98.35,3.2) 98.373,3.223 98.373,3.973 99.95,5.55 D3.2 ; R19.2 R18.2 104.204,38.716 104.412,38.924 104.412,39.049 104.763,39.4 VR2.3 ; K2.A1 110.35,35.1 VR2.3 ; C17.1 122.566,44.468 R21.1 122.566,48.284 122.55,48.3 ; JST3.1 134.89,57.7 134.89,47.86 133.83,46.8 126.47,46.8 124.97,48.3 122.55,48.3 ; JST4.1 134.89,71.95 ; 134.89,57.83 134.89,71.95 ; 45.03,41.1 49.66,41.1 49.68,41.12 ; 58.9,98.25 78.46,98.25 ; 78.46,98.25 98.78,98.25 ; 98.78,98.25 98.78,98.29 128.45,98.29 128.45,87.87 129.64,86.68 JST5.1 134.89,86.68 134.89,71.95 ; VR2.3 110.35,41.27 115.496,46.416 R22.2 117.634,48.3 122.55,48.3
  Top Layer w1.2: K1.A1 113.57,16.9 113.57,35 K2.A1
  Bottom Layer w0.6: VR1.3@46.07,73.95 VR1.3 47.79,73.91 53.26,68.44 53.26,42.12 v2(49.68,42.12) ; 53.466,42.12 57.19,42.12 v2(58.01,41.3) 61.49,41.3 ; v2(64.85,50.32) 61.49,46.96 61.49,41.3 ; H1.2 61.49,41.3 ; v2(82.21,34.76) v2(82.21,39.83)
  Bottom Layer w1.2: H2.2 38.75,92.265 38.75,98.25 ; VR1.3@46.07,73.95 H10.2 30.07,73.95 24.8,79.22 24.8,97.6 25.45,98.25 38.75,98.25 ; H3.2 58.78,92.265 58.78,98.25 ; H4.2 78.45,92.265 78.45,98.25 ; 79.8,1.95 98.35,1.95 ; H5.2 98.73,92.265 98.73,98.25 ; v2(98.35,3.2) 98.35,1.95 ; K1.A1 113.57,16.9 ; K2.A1 113.57,35 113.57,16.9 ; JST3.1 134.9,57.7 134.9,71.95 ; JST4.1 134.9,71.95 ; 38.75,98.25 58.78,98.25 ; 58.78,98.25 78.45,98.25 ; 78.45,98.25 98.73,98.25 ; 98.35,1.95 113.57,1.95 113.57,16.9 ; 98.73,98.25 128.45,98.25 128.45,88.32 130.09,86.68 JST5.1 134.9,86.68 134.9,71.95
  other v1: 73.138,2.286 80.458,2.286 73.138,4.572 80.458,4.572 73.138,6.604 80.458,6.604 73.138,8.636 75.886,8.636 77.918,8.636 80.458,8.636 64.55,8.9
+12: D2.1 K1.COM K2.COM X1.1 | length 42.4
  Top Layer w0.381: X1.1 X1.1@88.302,11.326
  Top Layer w1: X1.1@88.302,11.326 90.076,13.1 D2.1 v2(95.45,11)
  Bottom Layer w0.6: v2@95.45,10.9 v2(95.45,11)
  Bottom Layer w1: v2@95.45,10.9 K1.COM K2.COM
A0: C18.1 H9.1 R23.1 U1.97 U8.3 | length 123.7
  Top Layer w0.254: v2@49.12,49.6 v2(49.29,49.6) 49.328,49.562 U1.97 ; v2(114.17,40.09) v2@114.18,40.1
  Top Layer w0.381: v2@114.18,40.1 U8.3 117.05,40.1 119.65,37.5 122.188,37.5 123.434,38.746 C18.1 123.434,39.254 123.688,39.254 125.148,40.714 125.148,40.982 R23.1 126.066,40.7 H9.1
  Bottom Layer w0.254: v2(49.29,49.6) 46.81,47.12 46.81,25.89 49.296,23.404 93.224,23.404 107.57,37.75 111.93,37.75 114.17,39.99 v2(114.17,40.09)
ARD_RX: Q3.3 RN3.8 U1.45 | length 26.7
  Top Layer w0.254: U1.45 70.288,57.562 v2(70.32,57.53) ; v2(78.67,45.14) 78.675,45.145 Q3.3 81.795,45.145 83.05,46.4 83.289,46.639 83.927,46.639 RN3.8@84.2,46.912
  Bottom Layer w0.254: v2(70.32,57.53) 72.61,57.53 75.91,54.23 75.91,47.9 v2(78.67,45.14)
ARD_TX: Q2.3 RN3.7 U1.46 | length 37.7
  Top Layer w0.254: U1.46 69.032,58.062 69.45,58.48 v2(71.15,58.48) ; RN3.7 85.17,46.982 85.02,47.132 85.26,47.372 v2(85.26,49.1) ; v2(88.55,45.2) 88.605,45.145 Q2.3
  Bottom Layer w0.254: v2(71.15,58.48) 82.42,58.48 83.11,57.79 83.11,50.23 84.24,49.1 v2(85.26,49.1) 87.25,49.1 88.55,47.8 v2(88.55,45.2)
AREF: C6.1 U1.98 | length 4.9
  Top Layer w0.254: C6.1 48.106,47.236 49.932,49.062 U1.98
BR_MT: R16.1 U1.95 | length 96
  Top Layer w0.254: v2(48.74,51.54) 49.29,51.54 50.268,50.562 U1.95 ; v2@104,12.3 v2(104,12.31)
  Top Layer w0.381: R16.1 v2@104,12.3
  Bottom Layer w0.254: v2(48.74,51.54) 45.726,48.526 45.726,25.524 48.754,22.496 93.814,22.496 v2(104,12.31)
CMP: R10.1 R11.2 U5.3 | length 5
  Top Layer w0.381: U5.3 72.55,18.738 73.034,18.254 R11.2 R10.1
D0: J1.1 J1.2 LED4.2 R22.1 U1.25 U8.1 | length 59.7
  Top Layer w0.254: U1.25 65.513,44.657 65.77,44.4 J1.2 ; J1.1 77.88,44.4 v2(78.75,43.53)
  Top Layer w0.381: U8.1 115.75,42.66 R22.1 118.204,44.384 LED4.2 118.4,45.92 v2(118.11,46.21)
  Bottom Layer w0.254: v2(78.75,43.53) 91.03,43.53 93.67,46.17 118.05,46.17 118.09,46.21 v2(118.11,46.21)
D+: U2.5 X2.3 | length 18.9
  Top Layer w0.381: X2.3 49.7,10.15 48.15,11.7 48.15,13.6 54.862,20.312 U2.5
D-: U2.6 X2.2 | length 13.6
  Top Layer w0.381: X2.2 50.095,13.845 55.292,19.042 U2.6
DTR: C9.1 U2.13 | length 2.6
  Top Layer w0.381: U2.13 65.768,21.583 68.349,21.583 C9.1
E_RX: H6.8 Q2.2 RN3.5 | length 10.5
  Top Layer w0.254: RN3.5 86.9,47.012 87.173,47.285 87.223,47.285 87.333,47.395 88.319,47.395 ; H6.8 88.319,53.109 88.319,47.395 ; Q2.2 88.319,47.395
E_TX: H6.1 Q3.2 RN3.6 | length 15.4
  Top Layer w0.254: Q3.2 80.112,49.982 H6.1 81.88,51.7 83.15,52.97 85.38,52.97 85.68,52.67 85.68,50.33 86.001,50.008 86.001,47.014 RN3.6
ECH0: JST3.3 U1.35 | length 68.4
  Top Layer w0.254: U1.35 75.292,52.562 80.034,57.304 93.756,57.304 98.44,52.62 JST3.3
ECH1: JST4.3 U1.37 | length 70
  Top Layer w0.254: U1.37 74.932,53.562 79.582,58.212 97.622,58.212 106.28,66.87 JST4.3
ECH2: JST5.3 U1.39 | length 75.7
  Top Layer w0.254: U1.39 74.648,54.562 79.212,59.126 96.876,59.126 119.35,81.6 JST5.3
GATE_CMD: Q1.1 U5.1 | length 10.7
  Top Layer w0.381: Q1.1 70.967,12.95 71.25,13.233 U5.1
GND: C3.2 C4.2 C5.2 C6.2 C7.2 C8.1 C10.2 C11.2 C12.2 C13.1 C14.2 C15.2 C16.2 C17.2 C18.2 H1.6 H2.1 H3.1 H4.1 H5.1 H6.2 H7.2 H8.2 H9.2 H10.1 H10.5 H10.16 JST1.3 JST2.3 JST3.4 JST4.4 JST5.4 LED3.2 pad.2 Q4.2 Q5.2 R11.1 SW1.1 SW1.2 U1.11 U1.32 U1.62 U1.81 U1.99 U2.1 U3.1 U4.1 U5.4 U7.5 U7.6 U7.7 U7.8 U7.9 U7.10 U7.11 U7.12 U7.13 U8.4 VR1.1 VR2.1 X1.2 X1.3 X2.4 X2.5 | length 5.3
  Top Layer w0.254: 50.55,57.3 50.55,57.318 50.794,57.562 U1.81 ; 58.29,47.99 58.51,47.77 58.51,46.465 U1.11 ; U1.32 69.188,51.062 69.25,51
  other v1: 95.7,6.1 116.526,7.874 118.304,7.874 64.456,11.684 116.526,11.684 118.304,11.684 72.95,12 105.55,14 60.646,14.478 35.5,14.732 37.024,14.732 38.548,14.732 68.266,14.732 116.526,15.24 118.304,15.24 54.042,16.002 35.5,16.51 37.024,16.51 38.548,16.51 35.5,18.288 37.024,18.288 38.548,18.288 68.25,18.8 78.45,19.1 35.5,20.066 37.024,20.066 38.548,20.066 92.65,21.082 35.5,21.844 37.024,21.844 38.548,21.844 96.46,21.844 104.842,22.86 96.968,24.892 98.746,24.892 100.778,24.892 35.5,26.162 37.024,26.162 38.548,26.162 116.526,26.162 118.304,26.162 99.508,26.924 101.54,26.924 69.97,27.36 35.5,27.94 37.024,27.94 38.548,27.94 101.54,29.21 35.5,29.718 37.024,29.718 38.548,29.718 116.526,29.972 118.304,29.972 60.05,30.8 35.5,31.496 37.024,31.496 38.548,31.496 73.55,32 35.5,33.274 37.024,33.274 38.548,33.274 116.526,33.528 118.304,33.528 85.05,33.8 51.7,36 95.55,36.7 128.21,37.576 113.986,37.846 58,37.9 75.55,39.7 118.05,40.848 119.32,40.848 73.25,41.4 118.05,42.118 119.32,42.118 101.85,42.9 48.25,43.3 41.9,44 56.15,44.11 51.05,45.2 127.702,45.212 67.95,46.2 65.05,48.3 57.56,48.71 105.2,48.8 70.42,50.47 63.45,51.4 46.75,52.2 41.04,56.3 119.066,56.642 120.59,56.642 122.114,56.642 119.066,58.42 120.59,58.42 122.114,58.42 58.25,59.6 119.066,60.198 120.59,60.198 122.114,60.198 51.85,61.4 67.25,61.7 119.066,61.976 120.59,61.976 122.114,61.976 47.11,62.32 119.066,63.754 120.59,63.754 122.114,63.754 46.25,66.1 57.85,67.7 78.378,68.2 80.664,68.2 82.95,68.2 85.236,68.2 87.776,68.2 90.57,68.2 93.364,68.2 96.158,68.2 98.698,68.2 40.85,68.9 64.85,69.9 119.32,70.866 120.844,70.866 122.368,70.866 78.95,71.1 82.49,71.12 85.792,71.12 89.348,71.12 92.904,71.12 96.714,71.12 101.032,71.12 66.75,71.7 119.32,72.644 120.844,72.644 122.368,72.644 68.55,73.4 119.32,74.422 120.844,74.422 122.368,74.422 70.25,75 119.32,76.2 120.844,76.2 122.368,76.2 58.106,76.454 47.184,77.47 48.708,77.47 50.232,77.47 119.32,77.978 120.844,77.978 122.368,77.978 47.184,79.248 48.708,79.248 50.232,79.248 47.184,81.026 48.708,81.026 50.232,81.026 29.658,81.534 31.436,81.534 33.214,81.534 34.992,81.534 36.77,81.534 38.294,81.534 40.072,81.534 41.85,81.534 43.628,81.534 45.406,81.534 47.184,82.804 48.708,82.804 50.232,82.804 29.658,83.058 31.436,83.058 33.214,83.058 34.992,83.058 36.77,83.058 38.294,83.058 40.072,83.058 41.85,83.058 43.628,83.058 45.406,83.058 29.658,84.582 31.436,84.582 33.214,84.582 34.992,84.582 36.77,84.582 38.294,84.582 40.072,84.582 41.85,84.582 43.628,84.582 45.406,84.582 47.184,84.582 48.708,84.582 50.232,84.582 99.254,85.09 101.032,85.09 102.81,85.09 104.588,85.09 106.366,85.09 77.294,85.598 79.072,85.598 80.85,85.598 124.562,86 126.34,86 57.172,86.6 58.95,86.6 60.728,86.6 99.254,86.614 101.032,86.614 102.81,86.614 104.588,86.614 106.366,86.614 77.294,87.122 79.072,87.122 80.85,87.122 82.628,87.122 124.562,87.778 126.34,87.778 57.172,88.124 58.95,88.124 60.728,88.124 99.254,88.138 101.032,88.138 102.81,88.138 104.588,88.138 106.366,88.138 77.294,88.646 79.072,88.646 80.85,88.646 82.628,88.646 84.406,88.646 36.25,89.2 39.25,89.2 42.35,89.2 45.95,89.2 49.35,89.3 57.172,89.648 58.95,89.648 60.728,89.648 124.562,89.81 126.34,89.81
L_EN1: H5.3 U1.53 | length 47.3
  Top Layer w0.254: U1.53 64.513,64.053 70.818,70.358 74.316,70.358 92.47,88.512 92.47,93.535 H5.3
L_EN2: H4.3 U1.55 | length 37.6
  Top Layer w0.254: U1.55 63.513,64.373 72.45,73.31 72.45,93.815 73.44,94.805 H4.3
L_EN3: H3.3 U1.57 | length 37.8
  Top Layer w0.254: H3.3 52.52,93.585 52.52,87.53 62.513,77.537 U1.57
L_EN4: H2.3 U1.59 | length 55.2
  Top Layer w0.254: H2.3 32.255,93.52 32.255,90.055 34.924,87.386 51.064,87.386 61.513,76.937 U1.59
L_PWM1: H5.5 U1.18 | length 60.5
  Top Layer w0.254: v2(61.99,50.25) 62.013,50.227 U1.18
  Bottom Layer w0.254: v2(61.99,50.25) 61.99,51.147 61.991,51.148 61.991,51.712 61.99,51.713 61.99,63.98 88.67,90.66 88.67,92.275 H5.5
L_PWM2: H4.5 U1.16 | length 53.5
  Top Layer w0.254: v2(60.489,50.227) 60.489,49.471 61.013,48.947 U1.16
  Bottom Layer w0.254: v2(60.489,50.227) 60.489,84.094 H4.5 H4.5@70.685,94.805
L_PWM3: H3.5 U1.7 | length 50.6
  Top Layer w0.254: U1.7 56.513,50.213 v2(56.527,50.227)
  Bottom Layer w0.254: H3.5 52.43,93.575 52.43,86.92 56.527,82.823 v2(56.527,50.227)
L_PWM4: H2.5 U1.5 | length 68.2
  Top Layer w0.254: v2(54.983,50.227) 54.983,48.717 55.513,48.187 U1.5
  Bottom Layer w0.254: H2.5 32.25,93.555 32.25,88.96 33.916,87.294 50.456,87.294 55.001,82.749 55.001,50.245 v2(54.983,50.227)
LCD_D4: H10.11 U1.75 | length 22.4
  Top Layer w0.254: H10.11 39.1,51.09 50.89,62.88 53.2,62.88 53.513,62.567 U1.75
LCD_D5: H10.12 U1.76 | length 19.6
  Top Layer w0.254: H10.12 37.3,48.55 48.812,60.062 U1.76
LCD_D6: H10.13 U1.77 | length 22.6
  Top Layer w0.254: H10.13 39.19,46.01 43.27,50.09 43.27,53.73 49.1,59.56 51.6,59.56 51.602,59.562 U1.77
LCD_D7: H10.14 U1.78 | length 24
  Top Layer w0.254: H10.14 38.34,43.47 43.86,48.99 43.86,53.5 49.422,59.062 U1.78
LCD_EN: H10.6 U1.74 | length 18.8
  Top Layer w0.254: H10.6 53.15,63.79 54.01,62.93 54.01,61.57 54.013,61.573 U1.74
LCD_RS: H10.4 U1.73 | length 21.4
  Top Layer w0.254: H10.4 41.56,64.35 53.5,64.35 54.513,63.337 U1.73
MISO: H1.1 U1.22 | length 8.8
  Top Layer w0.254: U1.22@64.021,46.462 64.021,45.159 64.38,44.8 64.38,43.62 63.5,42.74 63.5,40.23 H1.1
MOSI: H1.4 U1.21 | length 8.6
  Top Layer w0.254: v2(63.51,44.1) 63.513,44.103 U1.21
  Bottom Layer w0.254: v2(63.51,44.1) 66.52,44.1 67.53,43.09 67.53,41.32 H1.4
NetD3_1: D3.1 K1.A2 Q4.3 | length 10.8
  Top Layer w0.381: Q4.3 102.775,9.1 103.059,8.815 103.059,8.79 103.658,8.192 D3.1
  Top Layer w0.6: D3.1 104.658,4.9 K1.A2
NetD4_1: D4.1 K2.A2 Q5.3 | length 12.7
  Top Layer w0.381: Q5.3@103.09,18.212 103.09,15.76 D4.1
  Top Layer w0.6: Q5.3 103.09,18.212 103.882,18.212 108.67,23 K2.A2
NetF_1: F.1 X2.1 | length 17
  Top Layer w0.6: X2.1 61,12.15 62.35,10.8 F.1
NetH7_1: H7.1 K1.NO
NetH8_1: H8.1 K2.NO
NetH10_3: H10.3 VR1.2 | length 13.1
  Top Layer w0.6: H10.3 37.04,71.37 VR1.2
  Bottom Layer w0.6: H10.3 37.04,71.38 37.05,71.37 VR1.2
NetH10_15: H10.15 R20.2 | length 3.7
  Top Layer w0.6: H10.15 37.04,40.98 36.98,40.92 R20.2
NetLED3_1: LED3.1 R9.2 | length 3.8
  Top Layer w0.381: LED3.1 44.47,28.072 46.998,25.544 R9.2
NetLED4_1: LED4.1 R21.2 | length 2.2
  Top Layer w0.254: R21.2 120.534,46.716 R21.2@120.55,46.7
  Top Layer w0.381: LED4.1 120.55,44.63 R21.2@120.55,46.7
NetQ4_1: Q4.1 R16.2 | length 2.3
  Top Layer w0.381: Q4.1 100.517,10.067 100.517,12.283 R16.2
NetQ5_1: Q5.1 R17.2 | length 2.1
  Top Layer w0.381: R17.2 100.544,21.29 100.544,19.172 Q5.1
NetU8_2: U8.2 VR2.2 | length 3.1
  Top Layer w0.381: VR2.2 113.053,41.94 113.623,41.37 U8.2
R5_2: LED2.2 RN1.7 U2.2 | length 10.4
  Top Layer w0.254: RN1.7 51.33,25.44 51.74,25.03 53.74,25.03 54.167,25.457 54.217,25.457 LED2.2@54.74,25.98
  Top Layer w0.381: LED2.2@54.74,25.98 55.199,25.52 55.249,25.52 56.648,24.122 U2.2
R6_2: LED1.2 RN1.8 U2.3 | length 15.7
  Top Layer w0.254: RN1.8 52.582,26.34 53.05,26.34 53.813,27.103 55.887,27.103 56.387,26.603 56.437,26.603 56.96,26.08 LED1.2
  Top Layer w0.381: LED1.2 57.46,26.53 61.36,26.53 61.79,26.1 61.79,23.39 61.252,22.852 U2.3
R7_2: LED1.1 RN1.5 | length 15.2
  Top Layer w0.254: RN1.5 49.59,26.028 v2(49.59,24.6)
  Top Layer w0.381: LED1.1 56.96,28.14 56.95,28.15 v2(58.64,28.15)
  Bottom Layer w0.254: v2(49.59,24.6) 49.59,24.43 50.14,23.88 55.79,23.88 58.64,26.73 v2(58.64,28.15)
R8_2: LED2.1 RN1.6 | length 10.9
  Top Layer w0.254: RN1.6 50.53,24.78 v2(50.74,24.57) ; LED2.1 v2(54.74,29.57)
  Bottom Layer w0.254: v2(50.74,24.57) 50.76,24.55 52.83,24.55 54.74,26.46 v2(54.74,29.57)
R_EN1: H5.4 U1.52 | length 44.5
  Top Layer w0.254: U1.52 65.013,63.845 71.072,69.904 74.504,69.904 93.74,89.14 H5.4
R_EN2: H4.4 U1.54 | length 34.6
  Top Layer w0.254: U1.54 64.013,64.223 73.74,73.95 H4.4
R_EN3: H3.4 U1.56 | length 34.4
  Top Layer w0.254: H3.4 53.74,87.06 63.013,77.787 U1.56
R_EN4: H2.4 U1.58 | length 51.9
  Top Layer w0.254: H2.4 33.54,89.54 35.24,87.84 51.41,87.84 62.013,77.237 U1.58
R_PWM1: H5.6 U1.17 | length 68.6
  Top Layer w0.254: v2(61.31,51.43) 61.3,51.42 61.3,49.44 61.513,49.227 U1.17
  Bottom Layer w0.254: v2(61.31,51.43) 61.31,64.06 88,90.75 88,94.42 89.9,96.32 91.83,96.32 92.48,95.67 92.48,93.53 91.215,92.265 H5.6
R_PWM2: H4.6 U1.15 | length 60.6
  Top Layer w0.254: v2(59.786,51.43) 59.786,49.304 60.513,48.577 U1.15
  Bottom Layer w0.254: v2(59.786,51.43) 59.786,84.236 69.55,94 69.55,95.3 70.58,96.33 71.54,96.33 72.45,95.42 72.45,93.515 H4.6
R_PWM3: H3.6 U1.6 | length 47.8
  Top Layer w0.254: v2(55.844,51.43) 55.844,48.766 56.013,48.597 U1.6
  Bottom Layer w0.254: H3.6 51.2,87.34 55.844,82.696 v2(55.844,51.43)
R_PWM4: H2.6 U1.1 | length 65.6
  Top Layer w0.254: U1.1 53.513,50.623 v2(54.32,51.43)
  Bottom Layer w0.254: H2.6 31,89.14 33.48,86.66 50.29,86.66 54.32,82.63 v2(54.32,51.43)
RESET: C7.1 C9.2 D1.1 H1.5 RN2.6 SW1.3 SW1.4 U1.30 | length 53.4
  Top Layer w0.254: U1.30 68.928,50.062 71.181,47.809 71.181,39.651 70.29,38.76 H1.5
  Top Layer w0.381: RN2.6 79.13,28.96 79.4,29.23 79.4,31.89 D1.1@79.145,32.145
  Top Layer w0.6: SW1.4 63.19,35.3 68.45,35.3 ; C9.2 68.35,35.2 68.45,35.3 ; H1.5 71.52,37.29 SW1.3 ; D1.1 79.145,32.145 C7.1 74.52,34.14 73.43,35.23 SW1.3 ; 68.45,35.3 71.45,35.3 SW1.3
RX0: RN1.2 U1.2 | length 20
  Top Layer w0.254: RN1.2 51.33,31.492 54.013,34.175 U1.2
RXD2: JST1.2 U1.12 | length 85.9
  Top Layer w0.254: U1.12@59.02,46.469 U1.12 59.013,48.357 58.62,48.75 58.62,53.52 59.24,54.14 v2(63.63,54.14)
  Bottom Layer w0.254: v2(63.63,54.14) 69.69,60.2 92.85,60.2 110.48,77.83 JST1.2
SCK: H1.3 U1.20 | length 14.1
  Top Layer w0.254: U1.20@63.005,46.462 63.005,44.735 62.47,44.2 62.47,38.73 63.71,37.49 66.37,37.49 67.51,38.63 H1.3
SCL: R18.1 RN2.7 U1.43 U7.16 | length 66.6
  Top Layer w0.254: U1.43 68.778,56.562 69.29,56.05 v2@71.17,56.05 ; U7.16@103.931,34.07 U7.16@103.95,34.051
  Top Layer w0.381: RN2.7 78.33,29.58 v2(78.35,29.6) ; v2(101.45,34.07) U7.16@103.931,34.07 ; U7.16@103.95,34.051 R18.1
  Bottom Layer w0.254: v2(71.17,56.02) 73.24,56.02 75.456,53.804 75.456,47.712 77.928,45.239 77.928,30.021 v2(78.35,29.6) 95.59,29.6 100.06,34.07 v2(101.45,34.07)
SDA: R19.1 RN2.8 U1.44 U7.15 | length 88.4
  Top Layer w0.254: U1.44 69.088,57.062 69.358,56.791 70.01,56.791 70.013,56.788 70.627,56.788 70.629,56.79 v2(74.62,56.79) ; v2(77.57,53.5) 80.92,56.85 93.49,56.85 95.83,54.51 95.83,41.86 101.006,36.684 101.104,36.684 R19.1 ; v2(100.08,32.78) 100.08,32.847 v2@100.152,32.775
  Top Layer w0.381: v2(76.87,29.63) 76.87,28.532 RN2.8 ; v2@100.08,32.847 100.08,35.66 R19.1@101.104,36.684 ; v2@100.152,32.775 U7.15
  Bottom Layer w0.254: v2(74.62,56.79) 77.57,53.84 v2(77.57,53.5) ; v2(76.87,29.63) 77.7,28.8 96.1,28.8 v2(100.08,32.78) v2@100.14,32.72
TRIG0: JST3.2 U1.36 | length 69.2
  Top Layer w0.254: U1.36 75.092,53.062 79.788,57.758 93.944,57.758 98.628,53.074 122.334,53.074 124.42,55.16 JST3.2
TRIG1: JST4.2 U1.38 | length 70.8
  Top Layer w0.254: U1.38 74.79,54.062 79.394,58.666 97.286,58.666 105.944,67.324 122.794,67.324 124.88,69.41 JST4.2
TRIG2: JST5.2 U1.40 | length 76.5
  Top Layer w0.254: U1.40 74.506,55.062 79.024,59.58 96.53,59.58 121.09,84.14 JST5.2
TX0: RN1.1 U1.3 | length 19.8
  Top Layer w0.254: RN1.1 52.28,31.51 54.51,33.74 54.51,44.65 54.513,44.653 U1.3
TXD2: JST1.1 U1.13 | length 86.4
  Top Layer w0.254: U1.13 59.513,48.697 59.1,49.11 59.1,52.56 59.8,53.26 v2(64.04,53.26)
  Bottom Layer w0.254: v2(64.04,53.26) 70.23,59.45 92.9,59.45 113.02,79.57 JST1.1
USBVCC: C10.1 F.2 Q1.3 | length 6.6
  Top Layer w0.6: C10.1 66.954,7.48 70.012,7.48 Q1.3 ; C10.1@66.955,7.479 66.955,4.438 66.788,4.272 F.2
VIN: C11.1 D2.2 R10.2 U3.3 | length 26.6
  Top Layer w0.6: U3.3 75.058,11.259 75.058,15.492 R10.2 75.376,15.81 80.15,15.81 83.16,18.82 C11.1 85.16,18.82 86.68,17.3 D2.2
W_PUMP: R17.1 U1.96 | length 88.3
  Top Layer w0.254: v2(48.76,50.45) 49.57,50.45 49.958,50.062 U1.96 ; v2@102.566,22.95 v2(102.57,22.95)
  Top Layer w0.381: R17.1 v2@102.566,22.95
  Bottom Layer w0.254: v2@48.66,50.55 v2(48.76,50.45) 46.27,47.96 46.27,25.68 49,22.95 v2(102.57,22.95)
WL_SEN_S: JST2.1 U1.51 | length 75.2
  Top Layer w0.254: U1.51 65.513,63.643 71.32,69.45 104.9,69.45 120.25,84.8 JST2.1
WL_SEN_V: JST2.2 U1.50 | length 74.6
  Top Layer w0.254: U1.50 96.232,60.062 122.79,86.62 JST2.2
XTAL-1: pad.3@72.325,49.662 R1.2 U1.33 | length 9
  Top Layer w0.254: U1.33 71.018,51.562 72.101,50.478 72.101,49.885 pad.3@72.325,49.662
  Top Layer w0.381: R1.2@72.325,46.991 pad.3@72.325,49.662
XTAL-2: pad.1@74.307,49.662 R1.1 U1.34 | length 11.7
  Top Layer w0.254: U1.34 73.318,52.062 74.307,51.073 74.307,49.662 pad.1@74.326,49.643
  Top Layer w0.381: R1.1 pad.1@74.326,49.643
pads on no net: H6.4 H6.5 H6.6 H10.7 H10.8 H10.9 H10.10 K1.NC K2.NC RN2.4 RN2.5 SW1.5 U1.4 U1.8 U1.9 U1.14 U1.19 U1.23 U1.24 U1.26 U1.27 U1.28 U1.29 U1.41 U1.42 U1.47 U1.48 U1.49 U1.60 U1.63 U1.64 U1.65 U1.66 U1.67 U1.68 U1.69 U1.70 U1.71 U1.72 U1.79 U1.82 U1.83 U1.84 U1.85 U1.86 U1.87 U1.88 U1.89 U1.90 U1.91 U1.92 U1.93 U1.94 U2.7 U2.8 U2.9 U2.10 U2.11 U2.12 U2.14 U2.15 U5.5 U5.6 U5.7 U7.1 U7.3 U7.4 U7.14 U8.5 U8.6 U8.7 X2.6
copper on no net: | length 7.2
  Top Layer w0.381: 56.378,15.785 58.435,15.785 59.152,16.502 59.823,16.502 ; 56.378,17.767 56.38,17.769 59.619,17.769 59.65,17.8 59.678,17.772 59.823,17.772

## Polygon pours and split planes (outlines as drawn)
GND on Top Layer "GND_L01_P020" (solid, pour order 20): 68.85,51.2 70.85,51.2 71.35,50.7 71.35,48.9 71.15,48.7 69.35,50.5 68.85,50.5
GND on Top Layer "GND_L01_P014" (solid, remove dead copper, pour order 14): 134.14,12.34 122.7,0.9 27.45,0.9 27.45,98.8 134.14,98.8
no net on Top Layer "Top Layer-No Net" (solid, pour order 10): 29.61,100.02
no net on Top Layer "Top Layer-No Net 1" (solid, pour order 8): 110.15,22.16
+5 on Top Layer "+5_L01_P000" (solid, remove dead copper, pour order 0): 81.15,9.97 61.95,9.97 61.95,0.7 81.15,0.7
NetH8_1 on Bottom Layer "NETH8_1_L02_P024" (solid, pour order 24): 132.8,29.45 133.49,28.76 133.49,26.67 128.04,21.22 121.56,21.22 120.91,21.87 120.91,24.06 121.57,24.72 127.32,24.72 130.11,27.51 130.11,28.8 130.76,29.45
NetH7_1 on Bottom Layer "NETH7_1_L02_P022" (solid, pour order 22): 132.8,14.45 133.4,13.85 133.4,11.58 125.23,3.41 121.56,3.41 120.91,4.06 120.91,5.98 121.62,6.69 124.29,6.69 130.11,12.51 130.11,13.8 130.76,14.45
GND on Bottom Layer "GND_L02_P016" (solid, remove dead copper, pour order 16): 134.12,12.27 122.74,0.89 27.43,0.89 27.43,97.19 134.12,97.19
+5 on Bottom Layer "+5_L02_P002" (solid, pour order 2): 81.15,0.7 81.89,1.35 81.15,2.22 81.15,9.8 61.95,9.8 61.95,0.7

## Keep-outs
Keep-Out Layer:
  circle w0.051: c133.411,93.989 r1.5
  circle w0.051: c133.411,4.829 r1.5
  circle w0.051: c9.331,5.599 r1.5
  circle w0.051: c9.331,93.989 r1.5
  lines w0.2: 0,0 0,100.69 138.79,100.69 138.79,0 0,0

## Silkscreen, mask and mechanical layers (free items; w line width, h text height)
Top Overlay:
  circle w0.254: c133.411,93.989 r2.5
  circle w0.254: c133.411,4.829 r2.5
  circle w0.254: c9.331,5.599 r2.5
  circle w0.254: c9.331,93.989 r2.5
  circle w0.25: c79.65,51.7 r0.3
  circle w0.25: c79.65,51.7 r0.12
  circle w0.25: c62.85,38.7 r0.12
  circle w0.25: c62.85,38.7 r0.3